# Altium PCB Acoustics_Preamp.PcbDoc
Units mil, origin at the board's own origin, x right, y up, seen from the top; angles counter-clockwise.
Board outline 550 x 1310 mil, 2 copper layers (Top Layer, Bottom Layer), stack 60.992 mil thick; 14 components, 9 nets, 39 pads, 7 vias.
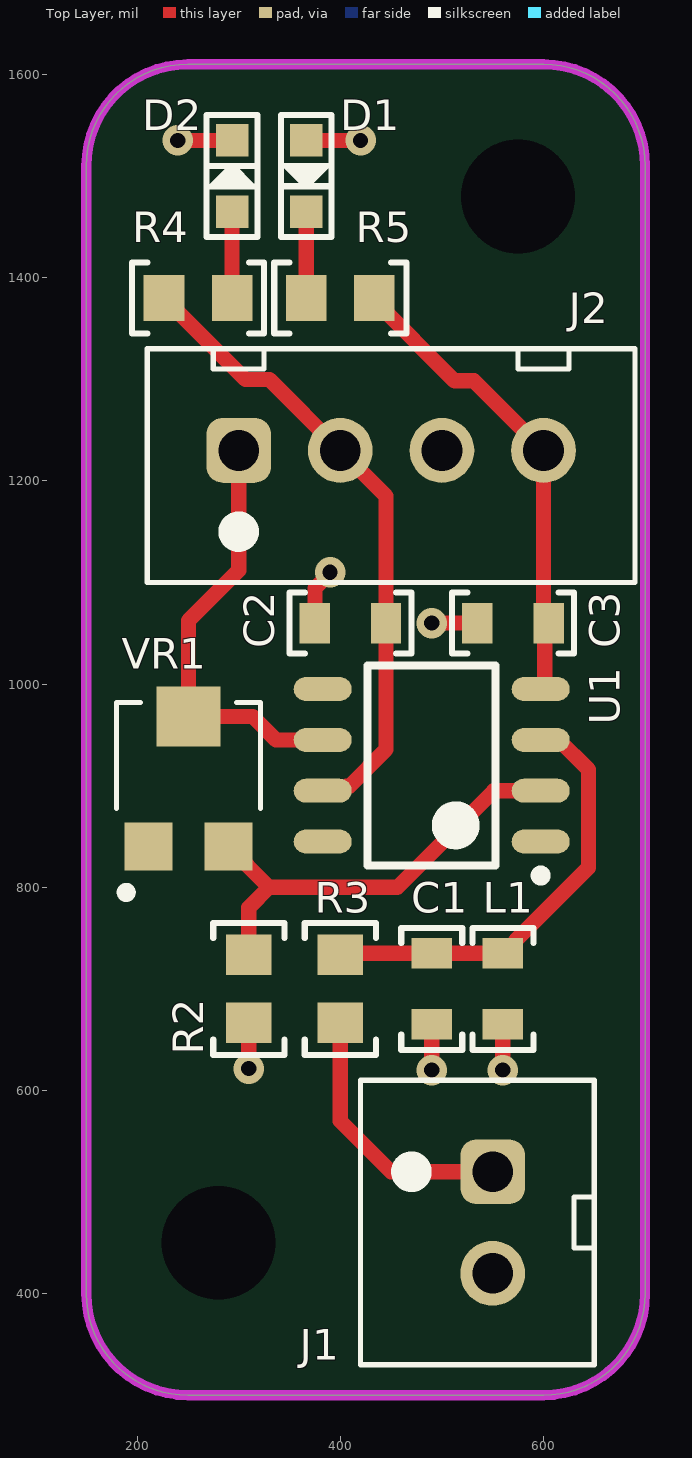
[diagram p0: Top Layer view]
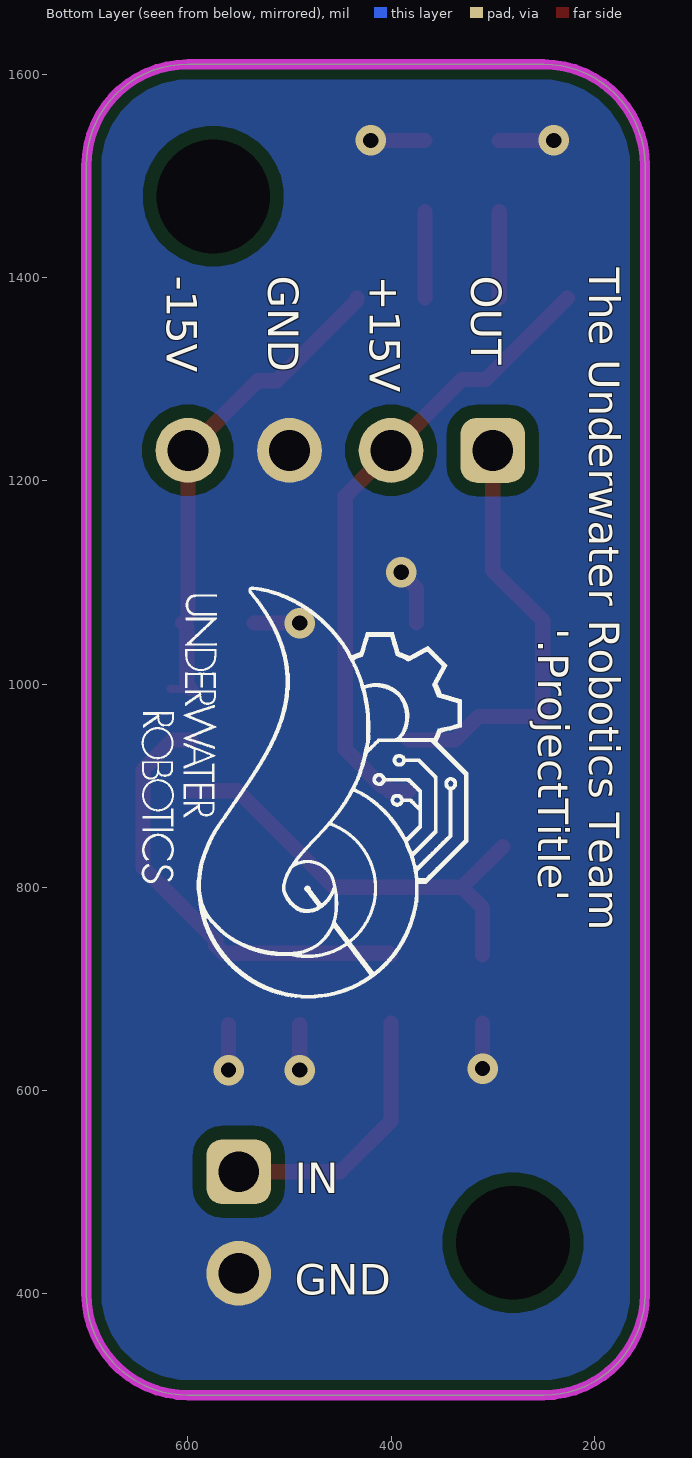
[diagram p1: Bottom Layer view, seen from below]
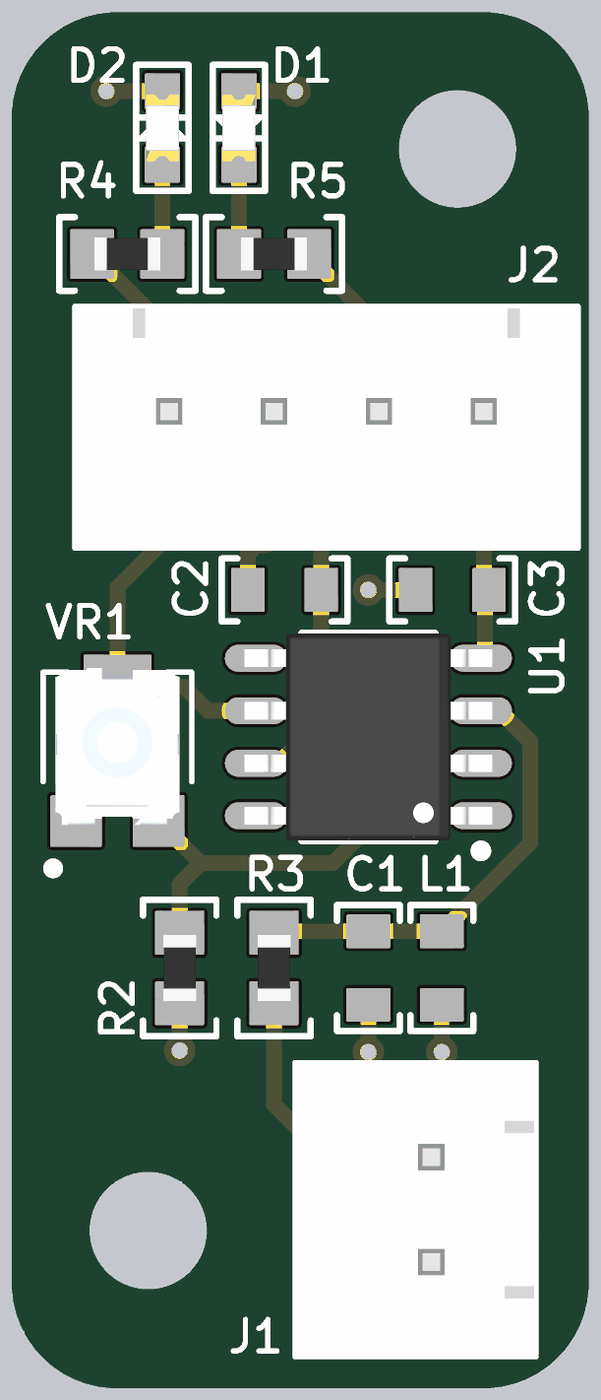
[diagram p2: 3D render of the assembled board from above, using the file's embedded part models]

## Layer stack, top to bottom
Top Solder: solder mask 1, SM-001, Dk 4
Top Layer: signal copper 1.378
Dielectric 3: core 58.236, Core-039, Dk 4.8
Bottom Layer: signal copper 1.378
Bottom Solder: solder mask 1, SM-001, Dk 4

## Board outline
150,400 150,1510 cw(c250,1510) 250,1610 600,1610 cw(c600,1510) 700,1510 700,400 cw(c600,400) 600,300 250,300 cw(c250,400)

## Design rules (kind name [scope] priority, off if disabled: settings)
AcuteAngle [All] p1: minimum=7.50000000000000E+0001 checktracksonly=FALSE
BoardOutlineClearance [(Not OnSilkscreen) Or (Not IsComponentPrimitive)] p1: gap=15 ignorepadtopadclearanceinfootprint=FALSE
Clearance "Clearance JLCPCB" [All] p1: gap=6 ignorepadtopadclearanceinfootprint=FALSE except(5: SMDPad-SMDPad; 10: Arc-Via Arc-Hole Track-Via Track-Hole Via-Via Via-Fill Via-Poly Via-Region Fill-Hole Poly-Hole Region-Hole; 13: Arc-THPad Track-THPad THPad-Fill THPad-Poly THPad-Region; 20: THPad-THPad)
ComponentOrientations [All] p1: allowedrotations=32
DiffPairsRouting CAN [All] p1: maxlimit=8 minlimit=8 mostfreqgap=8 toplayer_minwidth=8 toplayer_maxwidth=8 toplayer_prefwidth=8 bottomlayer_minwidth=8 bottomlayer_maxwidth=8 bottomlayer_prefwidth=8 impedanceprofiledriven=TRUE maxuncoupledlength=500
DiffPairsRouting "USB 2.0" [InDifferentialPairClass('USB 2.0')] p2: maxlimit=6 minlimit=6 mostfreqgap=6 toplayer_minwidth=15 toplayer_maxwidth=15 toplayer_prefwidth=15 bottomlayer_minwidth=15 bottomlayer_maxwidth=15 bottomlayer_prefwidth=15 maxuncoupledlength=500
DiffPairsRouting ETH [All] p3 off: maxlimit=4 minlimit=4 mostfreqgap=4 toplayer_minwidth=8 toplayer_maxwidth=8 toplayer_prefwidth=8 bottomlayer_minwidth=8 bottomlayer_maxwidth=8 bottomlayer_prefwidth=8 impedanceprofiledriven=TRUE maxuncoupledlength=500
FanoutControl Fanout_Default [All] p5: bgadir=Out bgaviamode=Centered fanoutstyle=Auto fanoutdirection=OutOnly viagrid=1 // Fanout_Default (Default Rule)
HoleSize "HoleSize JLCPCB" [All] p1: absolutevalues=TRUE maxlimit=245 minlimit=8 maxpercent=80.000 minpercent=20.000
HoleToHoleClearance "HoleToHoleClearance JLCPCB" [All] p1: gap=20 allowstackedmicrovias=TRUE
MinimumAnnularRing "MinimumAnnularRing JLCPCB" [All] p1: minimumring=6
MinimumSolderMaskSliver "MinimumSolderMaskSliver JLCPCB" [All] p1: minsoldermaskwidth=10
PasteMaskExpansion [All] p1: expansion=1
PolygonConnect [All] p1: connectstyle=Direct reliefconductorwidth=10 reliefentries=4 polygonreliefangle="90 Angle" airgapwidth=10
RoutingVias "RoutingVias JLCPCB" [All] p1: holewidth=10 width=22 viastyle="Through Hole" minholewidth=8 minwidth=20 maxholewidth=28 maxwidth=40
SMDToCorner [All] p1: distance=0
SMDToPlane [All] p1: distance=0
SilkToSilkClearance "SilkToSilkClearance JLCPCB" [All] p1: silktosilkclearance=3
SilkToSolderMaskClearance "SilkToSolderMaskClearance JLCPCB" [IsPad] p1: minsilkscreentomaskgap=6 clearancetoexposedcopper=TRUE
SolderMaskExpansion [All] p1: expansion=4 istentingtop=FALSE
UnRoutedNet [All] p1: checkbadconnections=TRUE
Width "Width JLCPCB" [All] p1: maxlimit=100 minlimit=6 preferedwidth=10
21 further rules are at their usual default settings.

## Components (designator, comment, footprint, x,y, rotation, side; value= is the part's Value field where it differs from the comment)
C1 "22uF Ceramic" CAPACITOR_0603 490,700 r270 top value=2.2uF
C2 "100nF Ceramic 25V" CAPACITOR_0603 410,1060 r180 top value=0.1uF
C3 "100nF Ceramic 25V" CAPACITOR_0603 570,1060 r180 top value=0.1uF
D1 "150060GS75000" LED_0603 366.5,1500 r270 top
D2 "150060GS75000" LED_0603 293.5,1500 r90 top
J1 "XH2.54 VERT" CONN_JST_XH254_2POS_VERT 550,520 r270 top
J2 "XH2.54 VERT" CONN_JST_XH254_4POS_VERT 300,1230 r0 top
L1 "FIXED IND 12UH 10MA 1.8 OHM SMD" INDUCTOR_0603 560,700 r270 top value=12uH
R2 "1k Ohm 5% 1/8W" RESISTOR_0603 310,700 r270 top
R3 "0.2 Ohm 5% 1/8W" RESISTOR_0603 400,700 r270 top
R4 "RC0603JR-1347KL" RESISTOR_0603 260,1380 r180 top
R5 "RC0603JR-1347KL" RESISTOR_0603 400,1380 r0 top
U1 "LM356MX/NOPB" SOIC-8 490,920 r180 top
VR1 "TC33X-2-103E" TRIM_TC33X-2-203E 250.63,910.87 r90 top

## Footprints (in the part's own frame and the unit in brackets; to place one, negate y for a bottom-side part, rotate by r counter-clockwise, add the part's x,y. Pads: shape width x height; smd on the part's side, far side on the other; paste and mask are expansions set on the pad)
CAPACITOR_0603 [mil] "CAPACITOR 0603"
  rect 30x40 smd: 1(-35,0) 2(35,0)
  silkscreen extent -60,-30 60,30, body extent -31,-16 32,16, height 31
CONN_JST_XH254_2POS_VERT [mm] "JST XH 2.54mm Pitch 2 Pos Vertical"
  rrect50% 1.62x1.62 hole 1.02: 1(0,0)
  round 1.62 hole 1.02: 2(2.54,0)
  silkscreen extent -2.29,-3.3 4.83,2.54, body extent -2.34,-3.35 4.88,2.49, height 7.21
CONN_JST_XH254_4POS_VERT [mm] "JST XH 2.54mm Pitch 4 Pos Vertical"
  rrect50% 1.62x1.62 hole 1.02: 1(0,0)
  round 1.62 hole 1.02: 2(2.54,0) 3(5.08,0) 4(7.62,0)
  silkscreen extent -2.29,-3.3 9.91,2.54, body extent -2.34,-3.35 9.96,2.49, height 7.21
INDUCTOR_0603 [mil] "INDUCTOR 0603"
  rect 30x40 smd: 1(-35,0) 2(35,0)
  silkscreen extent -60,-30 60,30, body extent -31,-16 32,16, height 31
LED_0603 [mil] "LED 0603"
  rect 32x32 smd: 1(-35,0) 2(35,0)
  silkscreen extent -60,-25 60,25, body extent -31,-16 32,16, height 28
RESISTOR_0603 [mil] "Resistor 0603"
  rect 40x45 smd: 1(-33.5,0) 2(33.5,0)
  silkscreen extent -65,-35 65,35, body extent -31,-16 32,16, height 16
SOIC-8 [mm] "SOIC, 8-Leads, Body 4.90x3.90mm, Pitch 1.27mm, IPC Medium Density"
  oval 1.45x0.6 smd: 1(-2.725,1.905) 2(-2.725,0.635) 3(-2.725,-0.635) 4(-2.725,-1.905) 5(2.725,-1.905) 6(2.725,-0.635) 7(2.725,0.635) 8(2.725,1.905)
  silkscreen extent -2.85,-2.5 1.6,2.88, body extent -3,-2.5 3,2.5, height 1.75
TRIM_TC33X-2-203E [mm]
  rect 1.2x1.2 smd: 1(-1.8,1) 3(-1.8,-1)
  rect 1.5x1.6 smd: 2(1.45,0)
  silkscreen extent -3.07,-1.8 1.8,1.8, body extent -1.9,-1.5 1.9,1.5, height 1.1

## Part data
C1: library part CAPACITOR_22uF_0603, "CAP CER 2.2PF 50V C0G/NP0 0603", Supplier Part Number 1=445-8028-1-ND, Tolerance="+/- 20%", Voltage=6.3V, Made By="Flip B", Supplier 1=Digi-Key
C2 C3: library part CAPACITOR_0.1uF_0603_25V, "Cap 100nF 25V +/-10% / Ceramic 0603", Supplier Part Number 1=1276-1006-1-ND, Tolerance="+/- 10%", Voltage=6.3V, ComponentLink1Description=Datsheet, ComponentLink1URL=https://www.mouser.com/datasheet/2/212/KEM_C1002_X7R_SMD-1102033.pdf, Made By="Flip B", Supplier 1=Digikey
D1 D2: library part LED_Green_0603_3.2V, "LED Green Vf= 3.2V If = 0.025A / 150060GS75000", Color=Green, Forward Current=25mA, Forward Voltage=3.2V, Package=0603, Supplier Part Number 1=732-4971-1-ND, ComponentLink1Description=Datasheet, ComponentLink1URL=https://www.we-online.de/katalog/datasheet/150060GS75000.pdf, Made By="Flip B", Supplier 1=Digi-Key
J1: library part CONN_JST_XH254_2POS_VERT, "JST XH 2.54mm Pitch 2 Pos Vertical", Color=White, Current Per Pin=4A, Manufacturer=JST, ComponentLink1Description="Purchase Link", ComponentLink1URL=https://www.amazon.com/460PCS-XH2-54-Connector-Terminal-Connectors/dp/B09DBGVX5C, Configuration=Vertical, Created By="Robert P", NOTE="Do not use JST 2.5mm parts with this footprint. JST does not make 2.54mm pitch pins, rather only clones make this connector!", Number of Positions=2, Pitch=2.54mm, Series="XH 2.54"
J2: library part CONN_JST_XH254_4POS_VERT, "JST XH 2.54mm Pitch 4 Pos Vertical", Color=White, Current Per Pin=4A, Manufacturer=JST, ComponentLink1Description="Purchase Link", ComponentLink1URL=https://www.amazon.com/460PCS-XH2-54-Connector-Terminal-Connectors/dp/B09DBGVX5C, Configuration=Vertical, Created By="Robert P", NOTE="Do not use JST 2.5mm parts with this footprint. JST does not make 2.54mm pitch pins, rather only clones make this connector!", Number of Positions=4, Pitch=2.54mm, Series="XH 2.54"
L1: library part INDUCTOR_12uH_0603, "12 µH Shielded Multilayer Inductor 10 mA 1.8Ohm Max 0603 (1608 Metric)", Current Rating=2.1A, DC Resistance=36mOhm, Supplier Part Number 1=MLF1608E120JTD25, Tolerance="+/- 20%", Made By="Robert Pafford", Supplier 1="Arrow Electronics"
R2: library part RESISTOR_1K_0603, "RES 1.8 OHM 5% 1/8W 0603", Digikey Part Numer=CR0603-JW-104ELFTR-ND, Supplier Part Number 1=2019-RK73B1JTTD102JCT-ND, Tolerance="+/- 5%", Value  (Ohms)=1K, ComponentLink1Description=Datasheet, ComponentLink1URL=https://www.bourns.com/docs/product-datasheets/CRxxxxx.pdf, Made By="Robert Pafford", Supplier=Digikey, Supplier 1=Digi-Key, Wattage=1/8W
R3: library part RESISTOR_0.2_0603, "RES 0.2 OHM 5% 1/8W 0603", Digikey Part Numer=CR0603-JW-104ELFTR-ND, Supplier Part Number 1=279-RLP73N1JR20JTD, Tolerance="+/- 5%", Value  (Ohms)=0.2, ComponentLink1Description=Datasheet, ComponentLink1URL=https://www.bourns.com/docs/product-datasheets/CRxxxxx.pdf, Made By="Robert Pafford", Supplier=Digikey, Supplier 1=Mouser, Wattage=1/8W
R4 R5: "47kohm 0603 1/10w", Mfr_Name=Yageo, Supplier Part Number 1=603-RC0603JR-1347KL, Copyright="Copyright (C) 2024 Ultra Librarian. All rights reserved.", Manufacturer_Part_Number=RC0603JR-1347KL, RefDes=RefDes, Supplier 1=Mouser, Type=DEV
U1: "IC OPAMP JFET 1 CIRCUIT 8SOIC", Manufacturer="Texas Instruments", PartNumber=LM8261M5X/NOPB, Supply Current="1.3 mA", Supply Voltage="2.5 V ~ 30 V, +/- 1.25 V ~ 15 V", ComponentLink1Description=Digi-Key, ComponentLink1URL=https://www.digikey.com/en/products/detail/texas-instruments/LF356MX-NOPB/366701, Created By="Dylan T", Gain Bandwidth Product="21 MHz"
VR1: library part TC33X-2-203E, "20 kOhms 0.1W, 1/10W J Lead Surface Mount Trimmer Potentiometer Cermet 1 Turn Top Adjustment", Package="1608 Bourns", Check_prices=https://www.snapeda.com/parts/TC33X-2-203E/Bourns/view-part/312812/?ref=eda, Digi-Key_Part_Number=TC33X-2-203ECT-ND, MF=Bourns, MP=TC33X-2-203E, Purchase-URL=https://pricing.snapeda.com/search/part/TC33X-2-203E/?ref=eda, SnapEDA_Link=https://www.snapeda.com/parts/TC33X-2-203E/Bourns/view-part/312812/?ref=snap

## Free pads (board coordinates)
  round 60 hole 112 unplated: 1(280,450) 1(575,1480)

## Via types
v1: diameter 30, hole 15, Top Layer to Bottom Layer, tented both sides, 7 vias

## Nets (pads, with @x,y where several pads share a name; then routed paths per layer and width w, separated by ;. In a path a pad name is that pad's centre, name@x,y a point inside that pad or via, vN(x,y) a via of type N, cw(c..) or ccw(c..) an arc to the next point about the centre after c; other vN are vias at no path point)
15V: C2.1 J2.2 R4.2 U1.7 | length 627.8
  Top Layer w15: R4.2 306.83,1299.67 330.33,1299.67 J2.2 445,1185 C2.1 445,935.51 408.8,899.31 406.09,899.31 401.78,895 U1.7
-15V: C3.1 J2.4 R5.2 U1.4 | length 490.3
  Top Layer w8: U1.4 U1.4@617.26,995
  Top Layer w15: R5.2 433.5,1377.5 512.58,1298.42 531.58,1298.42 J2.4 600,1065 C3.1 601.14,1056.14 601.14,998.86 U1.4
AMP_OUT: J2.1 U1.6 VR1.2 | length 424.1
  Top Layer w15: J2.1 300,1111.79 250.63,1062.42 VR1.2 313.86,967.95 336.81,945 U1.6
GND: C1.2 C2.2 C3.2 D1.1 D2.2 J1.2 J2.3 L1.2 R2.2 | length 343.2
  Top Layer w15: v1(240,1535) D2.2 ; v1(310,621.5) R2.2 ; D1.1 v1(420,1535) ; C2.2 375,1094.28 390,1109.28 v1(390,1110) ; v1(490,620) C1.2 ; v1(490,1060) C3.2 ; v1(560,620) L1.2
HYDRO_IN: J1.1 R3.2 | length 267.2
  Top Layer w15: R3.2 400,570 450,520 J1.1
NetC1_1: C1.1 L1.1 R3.1 U1.3 | length 438.3
  Top Layer w15: R3.1 401.5,735 565,735 572.5,742.5 572.5,747.5 644.24,819.24 644.24,915.76 615,945 U1.3
NetD1_2: D1.2 R5.1 | length 85
  Top Layer w15: R5.1 D1.2
NetD2_1: D2.1 R4.1 | length 85
  Top Layer w15: R4.1 D2.1
NetR2_1: R2.1 U1.2 VR1.3 | length 438
  Top Layer w15: VR1.3 330,800 ; R2.1 310,780 330,800 ; U1.2 551.14,895 456.14,800 330,800
pads on no net: U1.1 U1.5 U1.8 VR1.1

## Polygon pours and split planes (outlines as drawn)
GND on Bottom Layer "GND_PLANE" (solid, pour order 0): 150,400 150,1510 cw(c250,1510) 250,1610 600,1610 cw(c600,1510) 700,1510 700,400 cw(c600,400) 600,300 250,300 cw(c250,400)

## Keep-outs
Keep-Out Layer:
  the board outline again, w10

## Silkscreen, mask and mechanical layers (free items; w line width, h text height)
Bottom Overlay:
  drawing of 19 lines, arcs and shapes, not listed
  text "The Underwater Robotics Team" at 205,1409.74 h30 r90
  text "OUT" at 320.99,1401.76 h30 r90
  text "+15V" at 420.99,1401.97 h30 r90
  text "GND" at 520.99,1401.76 h30 r90
  text "-15V" at 620.99,1401.97 h30 r90
  text "'.ProjectTitle'" at 255,1054.85 h30 r90
  text "IN" at 494.8,499 h30
  text "GND" at 495,399 h30
Mechanical 1:
  circle w10: c575,1480 r125
  circle w10: c280,450 r125